# EAGLE board PCB (EAGLE 9.7.0)
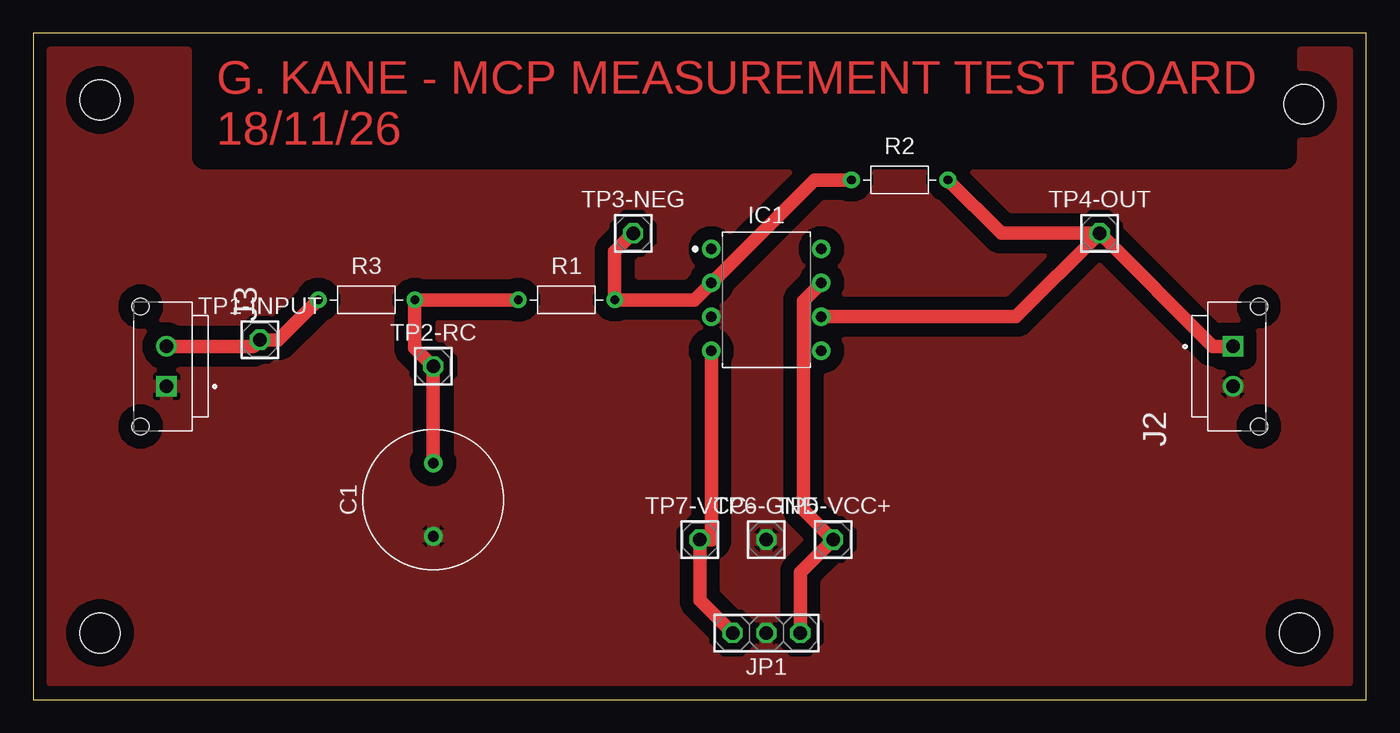
[diagram p0: board, top side]

Size 100 x 50 mm. Coordinates in mm from the lower left corner, seen from the top.
Outline: 0,0 100,0 100,50 0,50 0,0
Copper layers (1*16): Top / Bottom
Stack-up Default Layer Stack: Top SilkScreen Epoxy Ink / Top SolderMask SR:Green 0.0254mm Dk 4.3 / Top Surface Finish Lead-Free 0.02mm / Top CuFoil:007 0.035mm / Dielectric-1 User Defined 1.5mm / Bottom CuFoil:007 0.035mm / Bottom Surface Finish Lead-Free 0.02mm / Bottom SolderMask SR:Green 0.0254mm Dk 4.3 / Bottom SilkScreen Epoxy Ink
Design rules: minimum copper width 6mil, minimum drill size 0.35mm, copper clearance wire_polygon to wire_polygon 6mil, copper clearance wire_polygon to pad_smd 6mil, copper clearance wire_polygon to via 6mil, copper clearance pad_smd to pad_smd 6mil, copper clearance pad_smd to via 6mil, copper clearance via to via 6mil, copper clearance smd to pad (same net) 6mil, copper clearance smd to via (same net) 6mil, copper clearance smd to smd (same net) 6mil, dimension clearance 40mil, restrict clearance 0mil, via restrict clearance 0mil, drill distance 6mil, keepout clearance 0mil
Holes 3 mm at 5,5 95,5 95.32,44.68 5,45

## Footprints (pad centres in the part's own frame; a part is rotated, then mirrored left to right if it is on the bottom)
CAPRD550W60D1025H1250B = drill 0.8 pad 1.4: 1 -2.75,0; 2 2.75,0
DIP826W53P254L959H508Q8B = drill 0.786 pad 1.386: 1 -4.13,3.81; 2 -4.13,1.27; 3 -4.13,-1.27; 4 -4.13,-3.81; 5 4.13,-3.81; 6 4.13,-1.27; 7 4.13,1.27; 8 4.13,3.81
0436500215 = drill 1.02 square: 1 1.5,0 | drill 1.02: 2 -1.5,0 | hole 1.27: -4.5,-1.96; 4.5,-1.96
1X03 = drill 1.016 octagon: 1 -2.54,0; 2 0,0; 3 2.54,0
RESAD724W46L381D178B = drill 0.66 pad 1.26: 1 -3.62,0; 2 3.62,0
1X01 = drill 1.016 octagon: 1 0,0

## Placement (x,y rotation side)
C1  [CAPRD550W60D1025H1250B]  30,15 90 top
IC1  LM741  [DIP826W53P254L959H508Q8B]  55,30 0 top
J2  0436500215  [0436500215]  90,25 90 top
J3  0436500215  [0436500215]  10,25 270 top
JP1  PINHD-1X3  [1X03]  55,5 180 top
R1  [RESAD724W46L381D178B]  40,30 0 top
R2  [RESAD724W46L381D178B]  65,39 0 top
R3  [RESAD724W46L381D178B]  25,30 0 top
TP1-INPUT  PINHD-1X1  [1X01]  17,27 0 top
TP2-RC  PINHD-1X1  [1X01]  30,25 0 top
TP3-NEG  PINHD-1X1  [1X01]  45,35 0 top
TP4-OUT  PINHD-1X1  [1X01]  80,35 0 top
TP5-VCC+  PINHD-1X1  [1X01]  60,12 0 top
TP6-GND  PINHD-1X1  [1X01]  55,12 0 top
TP7-VCC-  PINHD-1X1  [1X01]  50,12 0 top

## Library data of the parts
C1 = Capacitor; CATEGORY_L1: Capacitor; CATEGORY_L2: Aluminum Non-Polar Capacitors; CATEGORY_L3: Radial Can; PACKAGE: Through Hole; PACKAGE_SIZE: 12.5MM-DIA
IC1 = IC_Linear; CATEGORY: Operational Amplifiers; DESCRIPTION: Operational Amplifier; MANUFACTURER: Generic; MPN: Generic; ROHS_COMPLIANT: ROHS3 Compliant; SERIES: LM741; SUB-CATEGORY: Amplifier ICs; TYPE: Op Amps
J2 J3 = Headers; CREATED_BY: PCBLayout.com; DIGIKEY_PN: WM1917-ND; MANUFACTURER: Molex; MPN: 0436500215
JP1 = Connector; CATEGORY_L1: Connectors; CATEGORY_L2: Headers; CATEGORY_L3: Male Pins; DESCRIPTION: Header-Straight-3 Position; PACKAGE: Through Hole; PITCH: 0.100" (2.54mm)
R1-R3 = Resistor; CATEGORY_L1: Resistors; DESCRIPTION: Axial Resistor 7.24 mm pitch 3.81 mm body length 1.78 mm body diameter; PACKAGE: Through Hole; PACKAGE_SIZE: Axial
TP1-INPUT TP2-RC TP3-NEG TP4-OUT TP5-VCC+ TP6-GND TP7-VCC- = Connector; CATEGORY_L1: Connectors; CATEGORY_L2: Headers; CATEGORY_L3: Male Pins; DESCRIPTION: Header-Straight-1 Position; PACKAGE: Through Hole; PITCH: 0.100" (2.54mm)

## Nets
GND: C1.1 IC1.3 J2.2 J3.1 JP1.2 TP6-GND.1
IN: J3.2 R3.1 TP1-INPUT.1
N$5: C1.2 R1.1 R3.2 TP2-RC.1
N$6: IC1.2 R1.2 R2.1 TP3-NEG.1
OUT: IC1.6 J2.1 R2.2 TP4-OUT.1
VCC+: IC1.7 JP1.1 TP5-VCC+.1
VCC-: IC1.4 JP1.3 TP7-VCC-.1

## Tracks (layer width: path | path; a pad name or v marks a point on that pad's centre or on a via)
GND
  pour Top (isolate 1.016): 0,50 100,50 100,-1 0,-1
IN
  Top 1.016: J3.2 16.5,26.5 TP1-INPUT.1 18.38,27 R3.1
N$5
  Top 1.016: R1.1 R3.2 28.62,26.38 TP2-RC.1 C1.2
N$6
  Top 1.016: TP3-NEG.1 43.62,33.62 R1.2 49.6,30 IC1.2 58.6,39 R2.1
OUT
  Top 1.016: R2.2 72.62,35 TP4-OUT.1 | IC1.6 73.73,28.73 TP4-OUT.1 | J2.1 88.5,26.5 TP4-OUT.1
VCC+
  Top 1.016: JP1.1 57.54,9.54 TP5-VCC+.1 57.78,14.22 57.78,29.92 IC1.7
VCC-
  Top 1.016: IC1.4 50.87,12 TP7-VCC-.1 50,7.46 JP1.3

## Text on the board
Top: G. KANE - MCP MEASUREMENT TEST BOARD / 18/11/26